# Altium PCB ESP_VGA.PcbDoc
Units mm, origin at the board's own origin, x right, y up, seen from the top; angles counter-clockwise.
Board outline 30.75 x 70 mm, 2 copper layers (Top Layer, Bottom Layer), stack 1.671 mm thick; 57 components, 54 nets, 209 pads, 74 vias.
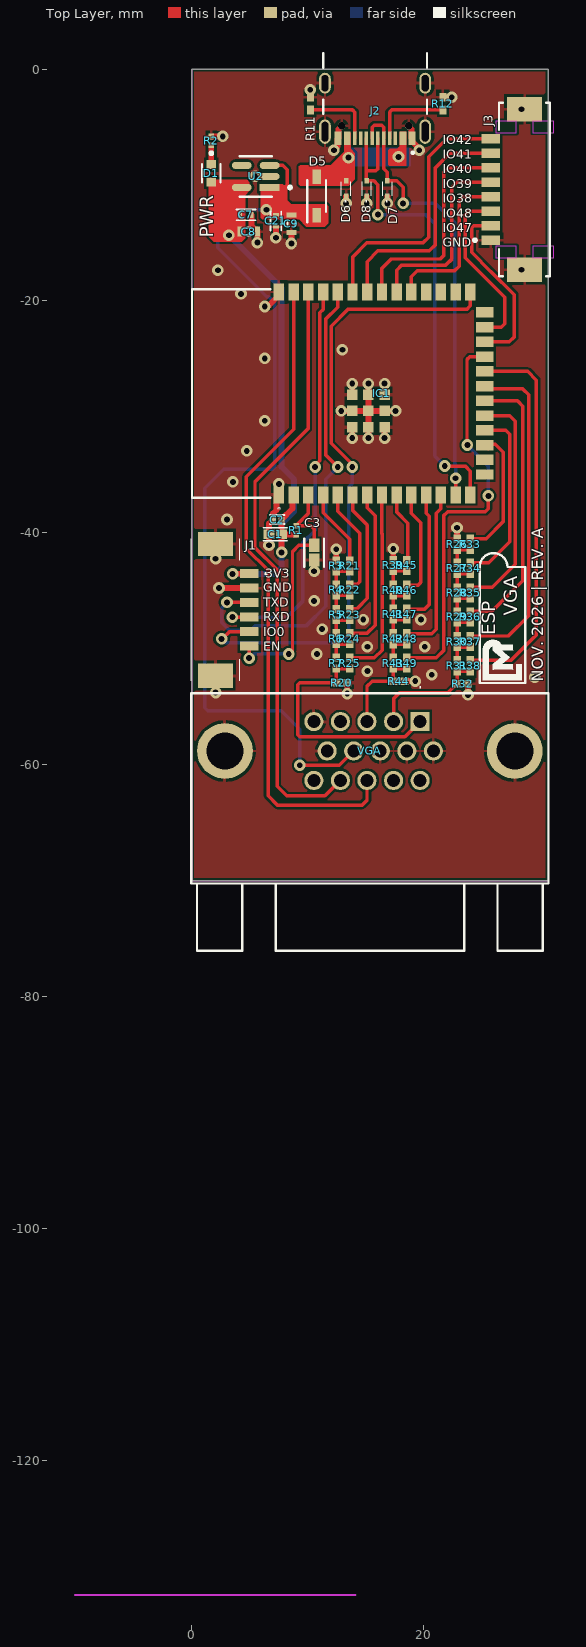
[diagram p0: Top Layer view]
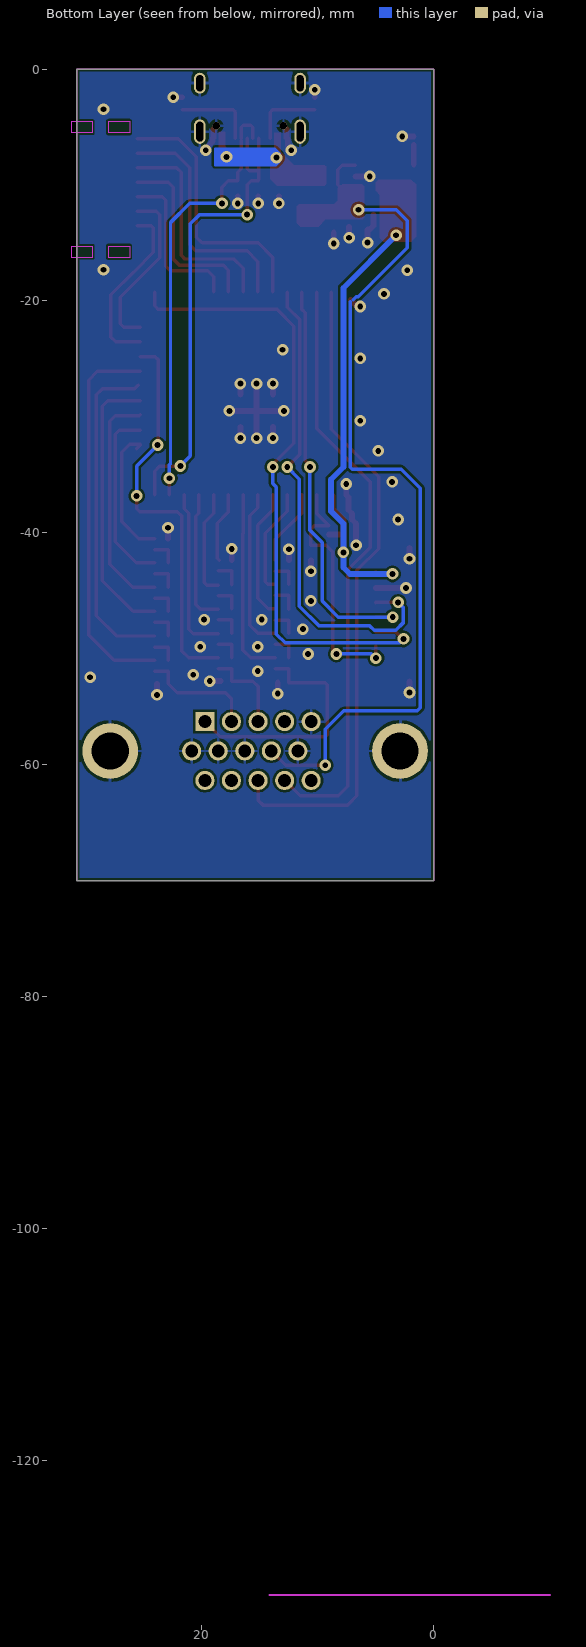
[diagram p1: Bottom Layer view, seen from below]

## Layer stack, top to bottom
Top Solder: solder mask 0.0102, Solder Resist, Dk 3.5
Top Layer: signal copper 0.0356
Dielectric 1: dielectric 1.6, FR-4, Dk 4.8
Bottom Layer: signal copper 0.0356
Bottom Solder: solder mask 0.0102, Solder Resist, Dk 3.5

## Board outline
0,-70 0,0 30.745,0 30.745,-70

## Design rules (kind name [scope] priority, off if disabled: settings)
Clearance [All] p1: gap=0.2 ignorepadtopadclearanceinfootprint=FALSE except(0.15: SMDPad-SMDPad)
Height [All] p1: minheight=0 maxheight=100 prefheight=12.7
PolygonConnect PolygonConnect_2 [HasFootprint('SOIC127P600X175-9N')] p1: connectstyle=Direct reliefconductorwidth=0.254 reliefentries=4 polygonreliefangle="90 Angle" airgapwidth=0.254
PolygonConnect PolygonConnect_1 [All] p2: thpad.connectstyle=Relief thpad.reliefconductorwidth=0.254 thpad.reliefentries=4 thpad.polygonreliefangle="90 Angle" thpad.airgapwidth=0.254 smdpad.connectstyle=Relief smdpad.reliefconductorwidth=0.254 smdpad.reliefentries=4 smdpad.polygonreliefangle="90 Angle" smdpad.airgapwidth=0.254 via.connectstyle=Direct via.reliefconductorwidth=0.254 via.reliefentries=4 via.polygonreliefangle="90 Angle" via.airgapwidth=0.254
RoutingVias [All] p1: holewidth=0.5 width=1 viastyle="Through Hole" minholewidth=0.5 minwidth=1 maxholewidth=0.5 maxwidth=1
SolderMaskExpansion [All] p1: expansion=0.102 istentingtop=FALSE
SupplyNets "Schematic Supply Nets_7" [InNet('+5V')] p1: voltage=0.000
SupplyNets "Schematic Supply Nets_6" [InNet('+3V3')] p2: voltage=0.000
SupplyNets "Schematic Supply Nets" [InNet('GND')] p3: voltage=0.000
SupplyNets "Schematic Supply Nets_3" [InNet('VBUS')] p4: voltage=0.000
Width [All] p1: maxlimit=1 minlimit=0.2 preferedwidth=0.2
29 further rules are at their usual default settings.

## Components (designator, comment, footprint, x,y, rotation, side; value= is the part's Value field where it differs from the comment)
C1 "C1608JB0J106K080AB" FP-C1608-080-0_1-IPC_C 7.217,-40.118 r180 top value=10u
C2 "C1005X7R1H104K050BB" FP-C1005-050-0_05-IPC_C 7.391,-38.843 r180 top value=100n
C3 "C1608X5R1H105K080AB" FP-C1608-080-0_1-IPC_B 10.569,-41.707 r270 top value=1u
C7 "C1005X5R1A105K050BB" CAPC1005X55X10LL05 4.681,-12.577 r0 top value=1µ
C8 "C1608X5R1E106M080AC" CAPC1608X100X20LL10 4.931,-14.02 r0 top value=10u
C9 "C1608X5R1E106M080AC" CAPC1608X100X20LL10 8.608,-13.343 r90 top value=10u
C21 "C1005X5R1A105K050BB" CAPC1005X55X10LL05 7.277,-13.093 r90 top value=1µ
D1 "LTST-C191KGKT" FP-LTST-C191KGKT-MFG 1.703,-8.989 r270 top value=Green
D5 "1N5819HW-7-F" SOD3716X125N 10.79,-10.943 r90 top locked
D6 "LESD5D5.0CT1G" LESD5D50CT1G 13.33,-10.308 r90 top locked
D7 "LESD5D5.0CT1G" LESD5D50CT1G 16.886,-10.308 r90 top locked
D8 "LESD5D5.0CT1G" LESD5D50CT1G 15.108,-10.308 r90 top locked
IC1 "ESP32-S3-WROOM-1-N16R8" ESP32S3WROOM1N16R8 12.791,-27.976 r90 top
J1 "53261-0671" 532610671 2.073,-46.626 r270 top
J2 "USB4105-GF-A" GCT_USB4105-GF-A 15.827,-1.221 r180 top
J3 "53261-0871" FP-532610871-MFG 28.71,-10.386 r270 top
R1 "RC0402FR-0710KL" RESC1005X40X25LL05T10 9.038,-39.755 r270 top value=10K
R2 "RC0402FR-07220RL" RESC1005X40X25LL05T10 1.703,-6.185 r270 top value=220
R3 "RC0402FR-07300RL" RESC1005X40X25ML05T10 12.47,-42.837 r90 top value=300R
R4 "RC0402FR-07150RL" RESC1005X40X25ML05T10 12.47,-44.909 r90 top value=150R
R5 "RC0402FR-07150RL" RESC1005X40X25ML05T10 12.475,-47.038 r90 top value=150R
R6 "RC0402FR-07150RL" RESC1005X40X25ML05T10 12.47,-49.106 r90 top value=150R
R7 "RC0402FR-07150RL" RESC1005X40X25ML05T10 12.475,-51.229 r90 top value=150R
R11 "RC0402FR-075K1P" RESC1005X40N 10.241,-2.98 r90 top value=5.1K
R12 "RC0402FR-075K1P" RESC1005X40N 21.671,-2.98 r90 top value=5.1K
R20 "RC0402FR-0782RL" RESC1005X40X25ML05T10 12.95,-52.906 r0 top value=82R
R21 "RC0402FR-07300RL" RESC1005X40X25ML05T10 13.634,-42.837 r270 top value=300R
R22 "RC0402FR-07300RL" RESC1005X40X25ML05T10 13.634,-44.911 r270 top value=300R
R23 "RC0402FR-07300RL" RESC1005X40X25ML05T10 13.634,-47.038 r270 top value=300R
R24 "RC0402FR-07300RL" RESC1005X40X25ML05T10 13.634,-49.106 r270 top value=300R
R25 "RC0402FR-07300RL" RESC1005X40X25ML05T10 13.634,-51.229 r270 top value=300R
R26 "RC0402FR-07300RL" RESC1005X40X25ML05T10 22.892,-40.97 r90 top value=300R
R27 "RC0402FR-07150RL" RESC1005X40X25ML05T10 22.892,-43.041 r90 top value=150R
R28 "RC0402FR-07150RL" RESC1005X40X25ML05T10 22.892,-45.171 r90 top value=150R
R29 "RC0402FR-07150RL" RESC1005X40X25ML05T10 22.892,-47.238 r90 top value=150R
R30 "RC0402FR-07150RL" RESC1005X40X25ML05T10 22.892,-49.362 r90 top value=150R
R31 "RC0402FR-07150RL" RESC1005X40X25ML05T10 22.892,-51.455 r90 top value=150R
R32 "RC0402FR-0782RL" RESC1005X40X25ML05T10 23.367,-53.013 r0 top value=82R
R33 "RC0402FR-07300RL" RESC1005X40X25ML05T10 24.043,-40.97 r270 top value=300R
R34 "RC0402FR-07300RL" RESC1005X40X25ML05T10 24.043,-43.041 r270 top value=300R
R35 "RC0402FR-07300RL" RESC1005X40X25ML05T10 24.043,-45.171 r270 top value=300R
R36 "RC0402FR-07300RL" RESC1005X40X25ML05T10 24.043,-47.238 r270 top value=300R
R37 "RC0402FR-07300RL" RESC1005X40X25ML05T10 24.043,-49.362 r270 top value=300R
R38 "RC0402FR-07300RL" RESC1005X40X25ML05T10 24.043,-51.455 r270 top value=300R
R39 "RC0402FR-07300RL" RESC1005X40X25ML05T10 17.39,-42.802 r90 top value=300R
R40 "RC0402FR-07150RL" RESC1005X40X25ML05T10 17.39,-44.932 r90 top value=150R
R41 "RC0402FR-07150RL" RESC1005X40X25ML05T10 17.39,-46.999 r90 top value=150R
R42 "RC0402FR-07150RL" RESC1005X40X25ML05T10 17.39,-49.123 r90 top value=150R
R43 "RC0402FR-07150RL" RESC1005X40X25ML05T10 17.39,-51.216 r90 top value=150R
R44 "RC0402FR-0782RL" RESC1005X40X25ML05T10 17.865,-52.775 r0 top value=82R
R45 "RC0402FR-07300RL" RESC1005X40X25ML05T10 18.551,-42.802 r270 top value=300R
R46 "RC0402FR-07300RL" RESC1005X40X25ML05T10 18.551,-44.932 r270 top value=300R
R47 "RC0402FR-07300RL" RESC1005X40X25ML05T10 18.551,-46.999 r270 top value=300R
R48 "RC0402FR-07300RL" RESC1005X40X25ML05T10 18.551,-49.123 r270 top value=300R
R49 "RC0402FR-07300RL" RESC1005X40X25ML05T10 18.551,-51.216 r270 top value=300R
U2 "AP2112K-3.3TRG1" FP-SOT25-IPC_A 5.535,-9.26 r180 top
VGA "L77HDE15SD1CH4FVGA" L77HDE15SD1CH4FVGA 19.709,-56.261 r0 top

## Footprints (in the part's own frame and the unit in brackets; to place one, negate y for a bottom-side part, rotate by r counter-clockwise, add the part's x,y. Pads: shape width x height; smd on the part's side, far side on the other; paste and mask are expansions set on the pad)
532610671 [mm]
  rect 0.8x1.6 smd: 1(-3.125,2.9) 2(-1.875,2.9) 3(-0.625,2.9) 4(0.625,2.9) 5(1.875,2.9) 6(3.125,2.9)
  rect 2.1x3 smd: MP1(-5.675,0) MP2(5.675,0)
  silkscreen extent -6.12,-2.1 6.12,4.4, body extent -6.32,-1.8 6.32,3.4, height 3.4
CAPC1005X55X10LL05 [mm] "Chip Capacitor, 2-Leads, Body 1.05x0.55mm, IPC High Density"
  rect 0.32x0.52 smd: 1(-0.5,0) 2(0.5,0)
  silkscreen extent -0.83,-0.46 0.83,0.46, body extent -0.53,-0.28 0.53,0.28, height 0.55
CAPC1608X100X20LL10 [mm] "Chip Capacitor, 2-Leads, Body 1.70x0.90mm, IPC High Density"
  rect 0.45x0.85 smd: 1(-0.75,0) 2(0.75,0)
  silkscreen extent -0.15,-0.33 0.15,0.33, body extent -0.85,-0.45 0.85,0.45, height 1
ESP32S3WROOM1N16R8 [mm]
  rect 1.5x0.9 smd: 1(-8.75,5.26) 2(-8.75,3.99) 3(-8.75,2.72) 4(-8.75,1.45) 5(-8.75,0.18) 6(-8.75,-1.09) 7(-8.75,-2.36) 8(-8.75,-3.63) 9(-8.75,-4.9) 10(-8.75,-6.17) 11(-8.75,-7.44) 12(-8.75,-8.71) 13(-8.75,-9.98) 14(-8.75,-11.25) 27(8.75,-11.25) 28(8.75,-9.98) 29(8.75,-8.71) 30(8.75,-7.44) 31(8.75,-6.17) 32(8.75,-4.9) 33(8.75,-3.63) 34(8.75,-2.36) 35(8.75,-1.09) 36(8.75,0.18) 37(8.75,1.45) 38(8.75,2.72) 39(8.75,3.99) 40(8.75,5.26)
  rect 0.9x1.5 smd: 15(-6.985,-12.5) 16(-5.715,-12.5) 17(-4.445,-12.5) 18(-3.175,-12.5) 19(-1.905,-12.5) 20(-0.635,-12.5) 21(0.635,-12.5) 22(1.905,-12.5) 23(3.175,-12.5) 24(4.445,-12.5) 25(5.715,-12.5) 26(6.985,-12.5)
  rect 0.9x0.9 smd: 41(-1.5,-2.46) 42(-2.9,-1.06) 43(-2.9,-2.46) 44(-2.9,-3.86) 45(-1.5,-3.86) 46(-0.1,-3.86) 47(-0.1,-2.46) 48(-0.1,-1.06) 49(-1.5,-1.06)
  silkscreen extent -9.96,5.15 9,12.75, body extent -9,-12.75 9,12.75, height 3.25
FP-532610871-MFG [mm]
  rect 0.8x1.6 smd paste+0 mask+0: 1(4.375,-2.9) 2(3.125,-2.9) 3(1.875,-2.9) 4(0.625,-2.9) 5(-0.625,-2.9) 6(-1.875,-2.9) 7(-3.125,-2.9) 8(-4.375,-2.9)
  rect 2.1x3 smd paste+0 mask+0: 9(-6.925,0) 10(6.925,0)
  Keep-Out Layer region: -5.875,0.7 -4.875,0.7 -4.875,2.5 -5.875,2.5
  Keep-Out Layer region: 4.875,0.7 5.875,0.7 5.875,2.5 4.875,2.5
  Keep-Out Layer region: 4.875,-2.5 5.875,-2.5 5.875,-0.7 4.875,-0.7
  Keep-Out Layer region: -5.875,-2.5 -4.875,-2.5 -4.875,-0.7 -5.875,-0.7
  silkscreen extent -7.47,-4.4 7.47,2.2, body extent -8.08,-3.8 8.08,2.3, height 0.25
FP-C1005-050-0_05-IPC_C [mm]
  rect 0.539x0.472 smd paste+0 mask+0: 1(-0.367,0) 2(0.367,0)
  silkscreen extent -0.64,-0.38 0.64,0.38, body extent -0.5,-0.25 0.5,0.25, height 0.55
FP-C1608-080-0_1-IPC_B [mm]
  rect 1.131x0.912 smd paste+0 mask+0: 1(-0.641,0) 2(0.641,0)
  silkscreen extent -1.21,-0.86 1.21,0.86, body extent -1.46,-0.71 1.46,0.71, height 0.25
FP-C1608-080-0_1-IPC_C [mm]
  rect 0.931x0.812 smd paste+0 mask+0: 1(-0.541,0) 2(0.541,0)
  silkscreen extent -1.01,-0.56 1.01,0.56, body extent -1.11,-0.55 1.11,0.55, height 0.25
FP-LTST-C191KGKT-MFG [mm]
  rect 0.8x0.8 smd paste+0 mask+0: 1(-0.75,0) 2(0.75,0)
  silkscreen extent -1.85,-0.8 0.8,0.8, body extent -1.25,-0.55 1.25,0.55, height 0.25
FP-SOT25-IPC_A [mm]
  rect 1.707x0.616 smd paste+0 mask+0: 1(-1.201,0.95)
  rrect100% 1.707x0.616 smd paste+0 mask+0: 2(-1.201,0) 3(-1.201,-0.95) 4(1.201,-0.95) 5(1.201,0.95)
  silkscreen extent -3.08,-1.75 1.4,1.75, body extent -2.55,-2 2.55,2, height 0.25
GCT_USB4105-GF-A [mm]
  rect 0.6x1.15 smd mask+0.05: A1_B12(-3.2,4.755) A4_B9(-2.4,4.755) B1_A12(3.2,4.755) B4_A9(2.4,4.755)
  rect 0.3x1.15 smd mask+0.05: A5(-1.25,4.755) A6(-0.25,4.755) A7(0.25,4.755) A8(1.25,4.755) B5(1.75,4.755) B6(0.75,4.755) B7(-0.75,4.755) B8(-1.75,4.755)
  oval 1x2.1 hole 0.6 slot 1.7 at 90 deg: SH1(-4.32,4.18) SH2(4.32,4.18)
  oval 1x1.8 hole 0.6 slot 1.4 at 90 deg: SH3(-4.32,0) SH4(4.32,0)
  round 0.65 hole 0.65 unplated: ""(-2.89,3.68) ""(2.89,3.68)
  silkscreen extent -4.47,-2.6 4.47,6.1, body extent -4.47,-2.47 4.47,5.24, height 3.31
L77HDE15SD1CH4FVGA [mm]
  rect 1.65x1.65 hole 1.1: 1(0,0)
  round 1.65 hole 1.1: 2(-2.29,0) 3(-4.58,0) 4(-6.87,0) 5(-9.16,0) 6(1.145,-2.54) 7(-1.145,-2.54) 8(-3.435,-2.54) 9(-5.725,-2.54) 10(-8.015,-2.54) 11(0,-5.08) 12(-2.29,-5.08) 13(-4.58,-5.08) 14(-6.87,-5.08) 15(-9.16,-5.08)
  round 4.8 hole 3.2: MH1(8.165,-2.54) MH2(-16.825,-2.54)
  silkscreen extent -19.73,-19.77 11.07,3, body extent -19.73,-19.89 11.08,2.21, height 12.47
LESD5D50CT1G [mm]
  rect 0.48x0.4 smd: 1(-0.66,0) 2(0.66,0)
  silkscreen extent -1.15,-0.4 0.6,0.4, body extent -0.8,-0.4 0.8,0.4, height 0.6
RESC1005X40N [mm]
  rect 0.75x0.6 smd: 1(-0.55,0) 2(0.55,0)
  body extent -0.5,-0.25 0.5,0.25, height 0.4
RESC1005X40X25LL05T10 [mm] "Chip Resistor, 2-Leads, Body 1.00x0.50mm, IPC High Density"
  rect 0.5x0.45 smd: 1(-0.375,0) 2(0.375,0)
  body extent -0.53,-0.27 0.53,0.28, height 0.4
RESC1005X40X25ML05T10 [mm] "Chip Resistor, 2-Leads, Body 1.00x0.50mm, IPC Low Density"
  rect 0.7x0.65 smd: 1(-0.475,0) 2(0.475,0)
  body extent -0.53,-0.27 0.53,0.28, height 0.4
SOD3716X125N [mm]
  rect 1.25x0.75 smd: 1(-1.65,0) 2(1.65,0)
  silkscreen extent -2.27,-0.8 1.35,0.8, body extent -1.35,-0.8 1.35,0.8, height 1.25

## Part data
C1: "MLCC 10μF ±10% 6.3V JB SMD 0603", Case Code (Imperial)=0603, Case Code (Metric)=1608, Dielectric Material=Ceramic, Max Operating Temperature=85°C, Min Operating Temperature=-25°C, Package Quantity=4000, Tolerance=10%, Voltage Rating=6.3V, Case/Package=0603, Height=0.8mm, Lead Free="Lead Free", Length=0.063inch, Mount="Surface Mount", Packaging="Tape and Reel", Resistor Type=Ceramic, RoHS Compliant=Yes, Series=C, Termination=SMD/SMT, Thickness=0.035inch, Voltage Rating (DC)=6.3V, Width=0.8mm
C2: "MLCC 100nF ±10% 50V X7R SMD 0402", Case Code (Imperial)=0402, Case Code (Metric)=1005, Dielectric=X7R, Dielectric Material=Ceramic, Max Operating Temperature=125°C, Min Operating Temperature=-55°C, Package Quantity=1, Tolerance=10%, Voltage=50V, Case/Package=0402, Construction=Flat, Depth=0.5mm, Height=0.5mm, Lead Free="Lead Free", Length=1mm, Mount="Surface Mount", Packaging="Tape and Reel", Part Number=C1005X7R1H104K050BB, Radiation Hardening=No, REACH SVHC="No SVHC", Resistor Type=Ceramic, RoHS Compliant=Yes, Series=C, Termination=SMD/SMT, Thickness=0.022inch, Voltage Rating=50V, Voltage Rating (DC)=50V, Weight=2.3E-05oz, Width=0.02inch
C3: "MLCC 1μF ±10% 50V X5R SMD 0603", Case Code (Imperial)=0603, Case Code (Metric)=1608, Dielectric=X5R, Dielectric Material=Ceramic, Max Operating Temperature=85°C, Min Operating Temperature=-55°C, Package Quantity=1, Tolerance=10%, Voltage=50V, Case/Package=0603, Construction=Flat, Depth=0.8mm, Height=0.8mm, Lead Free="Lead Free", Length=1.6mm, Mount="Surface Mount", Number of Pins=2, Packaging="Tape and Reel", Part Number=C1608X5R1H105K080AB, Radiation Hardening=No, REACH SVHC="No SVHC", Resistor Type=Ceramic, RoHS Compliant=Yes, Series=C, Termination=SMD/SMT, Thickness=0.035inch, Voltage Rating=50V, Voltage Rating (DC)=50V, Weight=7.1E-05oz, Width=0.031inch
C7 C21: "MLCC 1 uF, +/- 10%, 10 V, -55 to 85 degC, 0402 (1005 Metric), RoHS, Tape and Reel", Manufacturer=TDK, Operating Temperature=-55°C~85°C, Package / Case=0402(1005Metric), Package Description="2-Pin Surface Mount Device, Body 1 x 0.5 mm", Package Reference=1005, PCN Part Number=MLCCPartNumberChange30/Nov/2012, Ratings=-, Standard Package=1, Temperature Coefficient=X5R, Tolerance=±10%, Voltage - Rated=10V, Applications=GeneralPurpose, Category=Capacitors, Datasheet URL=http://download.siliconexpert.com/pdfs/2015/4/21/15/54/45/779/tdk_/manual/37024850441143360mlcc_commercial_general_en.pdf, Datasheet Version=03/2015, Family=CeramicCapacitors, Features=-, Height - Seated (Max)=-, Lead Spacing=-, Lead Style=-, Manufacturer URL=http://www.tdk.com/, Mounting Technology=SurfaceMount, Mounting Type=SurfaceMount,MLCC, Online Catalog=CSeries,GeneralPurpose, Other Names=445-4114-6, Packaging=Digi-Reel®, Part Number=C1005X5R1A105K050BB, Product Training Modules=CSeriesGeneralApplicationsSEAT,CCV,andTVCLDesignToolsGuidetoReplacinganElectrolyticCapacitorwithanMLCC, RoHS Information=RoHSCertificate-MLCC, Series=C, Size / Dimension="0.039\"Lx0.020\"W(1.00mmx0.50mm)", Thickness (Max)="0.022\"(0.55mm)"
C8 C9: "MLCC 10UF, 25V", Manufacturer_Name=TDK, Mouser Part Number=810-C1608X5R1E106M, Arrow Part Number=C1608X5R1E106M080AC, Arrow Price/Stock=https://www.arrow.com/en/products/c1608x5r1e106m080ac/tdk.html?utm_currency=USD&region=nac, Datasheet Link=https://product.tdk.com/info/en/catalog/datasheets/mlcc_commercial_midvoltage_en.pdf, Height=0.8mm, Manufacturer_Part_Number=C1608X5R1E106M080AC, Mouser Price/Stock=https://www.mouser.co.uk/ProductDetail/TDK/C1608X5R1E106M080AC?qs=dfay7wIA1uGdHfZTkqsICA%3D%3D
D1: "LED GREEN CLEAR SMD", Case Code (Imperial)=0603, Case Code (Metric)=1608, Forward Current=20mA, Forward Voltage=2V, Illumination Color=Green, Lens Color="Clear, Colorless", Max Operating Temperature=85°C, Min Operating Temperature=-55°C, Power Dissipation=75mW, Reverse Voltage=5V, Case/Package=0603, Depth=800µm, Dominant Wavelength=571nm, Height=550µm, Lead Free="Lead Free", Length=1.6mm, Lens Style=Clear, Lens Transparency=Clear, Luminous Intensity=35mcd, Mount="Surface Mount", NexarPartId=549907, Number of Elements=1, Number of LEDs=1, Number of Pins=2, Packaging="Tape and Reel", Power Rating=75mW, Radiation Hardening=No, RoHS=Compliant, Schedule B="8541402000, 8541402000", Test Current=20mA, Viewing Angle=130°, Wavelength=574nm, Width=800µm
D5: "Diode", Manufacturer_Name="Multicomp Pro", Datasheet Link=http://www.farnell.com/datasheets/1693720.pdf, Height=1.25mm, Manufacturer_Part_Number=1N5819HW-7-F
D6 D7 D8: "TVS Diode (Bi-directional)", Manufacturer_Name=LRC, Height=0.7mm, Manufacturer_Part_Number=LESD5D5.0CT1G
IC1: "Integrated Circuit", Manufacturer_Name="Espressif Systems", Mouser Part Number=356-ESP32S3WRM1N16R8, Datasheet Link=https://www.espressif.com/sites/default/files/documentation/esp32-s3-wroom-1_wroom-1u_datasheet_en.pdf, Height=3.25mm, Manufacturer_Part_Number=ESP32-S3-WROOM-1-N16R8, Mouser Price/Stock=https://www.mouser.co.uk/ProductDetail/Espressif-Systems/ESP32-S3-WROOM-1-N16R8?qs=Li%252BoUPsLEnvQc9gW6AMhZg%3D%3D
J1: "Connector", Manufacturer_Name=Molex, Mouser Part Number=538-53261-0671, Arrow Part Number=53261-0671, Arrow Price/Stock=https://www.arrow.com/en/products/53261-0671/molex?region=nac, Datasheet Link=https://www.molex.com/pdm_docs/sd/532610671_sd.pdf, Height=3.6mm, Manufacturer_Part_Number=53261-0671, Mouser Price/Stock=https://www.mouser.co.uk/ProductDetail/Molex/53261-0671?qs=%252B72YyncTwW9Wyr77z4J2cA%3D%3D
J2: Package=None, Availability=Unavailable, MF="{'manufacturer': u'GCT'}", MP=USB4105-GF-A, Price=None
J3: library part CMP-04776-000063-2, "CONN HEADER SMD R/A 8POS 1.25MM", Ambient Temperature Range High=105°C, Color=Beige, Contact Resistance=20mΩ, Current Rating=1A, Flammability Rating="UL94 V-0", Insulation Resistance=100MΩ, Manufacturer Lifecycle Status=ACTIVE, Max Operating Temperature=85°C, Min Operating Temperature=-40°C, Voltage Rating=125V, Contact Material="Brass, Tin", Contact Plating=Tin, Country of Origin=SG, Gender=Male, Glow Wire Compliant=Non-compliant, Height=3.6mm, Housing Material=Thermoplastic, Lead Free="Lead Free", Lead Pitch=1.25mm, Lifecycle Status=Production, Mount="Surface Mount", NexarPartId=655316, Number of Circuits=8, Number of Contacts=8, Number of Pins=8, Number of Positions=8, Number of Rows=1, Orientation="Right Angle", Packaging="Cut Tape", Pitch=1.25mm, Plating=Tin, Radiation Hardening=No, REACH SVHC=Unknown, RoHS=Compliant, Schedule B=8536694040, Termination=Solder, Voltage Rating (AC)=125V, Voltage Rating (DC)=125V, Working Voltage=125V
R1 R2 R3 R4 R5 R6 R7 R20 R21 R22 R23 R24 R25 R26 R27 R28 R29 R30 R31 R32 R33 R34 R35 R36 R37 R38 R39 R40 R41 R42 R43 R44 R45 R46 R47 R48 R49: Manufacturer="Yageo / Phycomp"
  R1: Part Number=RC0402FR-0710KL
  R2: Part Number=RC0402FR-07220RL, Supplier 1=Avnet, Supplier Part Number 1=RC0402FR-07220RL
  R3 R21 R22 R23 R24 R25 R26 R33 R34 R35 R36 R37 R38 R39 R45 R46 R47 R48 R49: Part Number=RC0402FR-07300RL
  R4 R5 R6 R7 R27 R28 R29 R30 R31 R40 R41 R42 R43: Part Number=RC0402FR-07150RL
  R20 R32 R44: Part Number=RC0402FR-0782RL
R11 R12: library part RES, "RES SMD 5.1KOHM 1% 1/16W 0402", Manufacturer=Yageo, Package Size="0402 (1005 Metric)", Rated Power="0.063W, 1/16W", Temperature Coefficient=100ppm/C, Tolerance=1%, CLASS=DISCRETE, PART_NUMBER=TMP-441
U2: library part CMP-12756-000035-1, "IC REG LINEAR 3.3V 600MA SOT25", Case/Package=SOT-23-5, Dropout Voltage=250mV, Max Input Voltage=6V, Max Operating Temperature=85°C, Max Output Current=600mA, Min Input Voltage=2.5V, Min Operating Temperature=-40°C, Output Voltage=3.3V, Package Quantity=1, Quiescent Current=55uA, Accuracy=1.5%, Height=1.3mm, Lead Free="Lead Free", Length=3.1mm, Mount="Surface Mount", Number Of Outputs=1, Number of Pins=5, Number of Regulators=1, Output Current=600mA, Output Type=Fixed, Packaging="Tape and Reel", Polarity=Positive, Width=1.7mm
VGA: "Connector", Manufacturer_Name="Amphenol Communications Solutions", Mouser Part Number=523-7HDE15SD1CH4FVGA, Arrow Part Number=L77HDE15SD1CH4FVGA, Arrow Price/Stock=https://www.arrow.com/en/products/l77hde15sd1ch4fvga/amphenol-fci.html?utm_currency=USD&region=nac, Datasheet Link=https://cdn.amphenol-cs.com/media/wysiwyg/files/drawing/l77hde15sd1ch4fvga.pdf, Height=12.85mm, Manufacturer_Part_Number=L77HDE15SD1CH4FVGA, Mouser Price/Stock=https://www.mouser.co.uk/ProductDetail/Amphenol-Commercial-Products/L77HDE15SD1CH4FVGA?qs=ToP8pWlZ0bNtQSp9f8k5Rw%3D%3D

## Via types
v1: diameter 1, hole 0.5, Top Layer to Bottom Layer, tented both sides, 74 vias

## Nets (pads, with @x,y where several pads share a name; then routed paths per layer and width w, separated by ;. In a path a pad name is that pad's centre, name@x,y a point inside that pad or via, vN(x,y) a via of type N, cw(c..) or ccw(c..) an arc to the next point about the centre after c; other vN are vias at no path point)
+3V3: C1.1 C2.1 C7.1 C8.1 D1.2 IC1.2 J1.1 R1.2 U2.5 | length 48.6
  Top Layer w0.5: v1(3.224,-14.336) 4.182,-13.379 C7.1@4.182,-12.587 ; v1(3.538,-43.531) 3.553,-43.516 4.958,-43.516 J1.1 ; C7.1 4.182,-11.42 4.334,-11.268 U2.5 ; C1.1 C1.1@7.764,-40.125 ; C2.1@7.764,-38.843 C1.1@7.764,-40.125 ; v1(7.77,-41.681) 7.764,-41.675 C1.1@7.764,-40.125 ; C2.1@7.777,-38.829 8.711,-37.896 8.711,-36.816 IC1.2 ; R1.2 7.769,-40.13 C1.1@7.764,-40.125
  Bottom Layer w0.5: v1(3.224,-14.336) 7.77,-18.882 7.77,-34.311 8.847,-35.388 8.847,-38.132 7.77,-39.209 v1(7.77,-41.681) 7.77,-42.971 7.21,-43.531 v1(3.538,-43.531)
+5V: C9.2 C21.2 D5.1 U2.1 U2.3 VGA.9 | length 75.2
  Top Layer w0.3: U2.1 8.017,-10.21 8.242,-9.985 8.242,-8.674 7.878,-8.31 U2.3 ; v1(9.333,-60.037) 12.749,-60.037 VGA.9
  Bottom Layer w0.3: v1(6.458,-12.134) 3.224,-12.134 2.271,-13.088 2.271,-15.397 6.497,-19.623 6.672,-19.623 6.927,-19.878 ; 7.17,-20.046 7.17,-34.322 6.995,-34.497 2.773,-34.497 1.128,-36.142 1.128,-55.065 1.408,-55.344 7.737,-55.344 9.333,-56.94 v1(9.333,-60.037)
CC1+: J2.A5 R12.1 | length 6.9
  Top Layer w0.3: J2.A5 17.077,-3.706 17.253,-3.53 R12.1
CC2+: J2.B5 R11.1 | length 6.2
  Top Layer w0.3: R11.1 13.881,-3.53 14.077,-3.727 J2.B5
CHIP_PU: C3.1 IC1.3 J1.6 R1.1 | length 21.8
  Top Layer w0.3: v1(4.965,-50.787) 4.965,-49.759 J1.6 ; v1(8.376,-50.435) 8.707,-50.104 8.707,-41.605 9.246,-41.066 C3.1 10.569,-39.673 10.275,-39.38 R1.1 9.038,-39.355 10.071,-38.321 IC1.3
  Bottom Layer w0.3: v1(4.965,-50.787) 5.053,-50.699 5.124,-50.699 5.388,-50.435 v1(8.376,-50.435)
D+: D8.2 IC1.14 J2.A6 J2.B6 | length 41.8
  Top Layer w0.3: D8.2@15.077,-9.49 15.077,-8.784 ; J2.B6 15.077,-8.784 ; D8.2 15.731,-9.648 16.071,-9.989 v1(16.071,-12.548) ; 16.071,-8.54 16.077,-8.534 ; J2.A6 16.077,-8.534 ; v1(21.827,-34.231) 23.595,-34.231 24.041,-34.678 IC1.14 ; 15.077,-8.784 15.901,-8.784 16.077,-8.608 16.077,-8.534
  Bottom Layer w0.3: v1(16.071,-12.548) 20.155,-12.548 20.962,-13.355 20.962,-33.366 v1(21.827,-34.231)
D-: D7.2 IC1.13 J2.A7 J2.B7 | length 38.3
  Top Layer w0.3: J2.A7 15.577,-5.019 15.753,-4.843 16.401,-4.843 16.577,-5.019 J2.B7 ; J2.B7@16.577,-6.166 16.577,-8.602 16.886,-8.911 D7.2 17.685,-9.648 18.242,-10.205 v1(18.242,-11.583) ; IC1.13 v1(22.771,-35.277)
  Bottom Layer w0.3: v1(18.242,-11.583) 21.026,-11.583 22.677,-13.234 22.677,-34.019 22.771,-34.113 v1(22.771,-35.277)
GND: C1.2 C2.2 C3.2 C7.2 C8.2 C9.1 C21.1 D6.1 D7.1 D8.1 IC1.1 IC1.40 IC1.41 IC1.42 IC1.43 IC1.44 IC1.45 IC1.46 IC1.47 IC1.48 IC1.49 J1.2 J1.MP1 J1.MP2 J2. J2.A1_B12 J2.B1_A12 J2.SH1 J2.SH2 J2.SH3 J2.SH4 J3.1 J3.9 J3.10 R2.1 R3.2 R11.2 R12.2 R20.2 R26.2 R32.2 R39.2 R44.2 U2.2 VGA.5 VGA.6 VGA.7 VGA.8 VGA.10 VGA.MH1 VGA.MH2 | length 45.9
  Top Layer w0.5: R2.1 v1(2.701,-5.81) ; v1(2.073,-53.759) J1.MP2@2.073,-52.811 ; v1(2.073,-42.222) J1.MP1@2.073,-41.274 ; v1(2.372,-44.751) J1.2 ; C7.2 5.181,-13.52 5.506,-13.845 5.656,-13.845 5.681,-13.87 C8.2 v1(5.681,-14.968) ; v1(5.503,-9.26) U2.2 ; v1(6.32,-20.473) 6.416,-20.377 6.688,-20.377 IC1.40@7.14,-19.925 ; v1(6.677,-41.066) C1.2 6.677,-39.185 7.024,-38.837 7.024,-38.321 7.331,-38.014 7.331,-36.926 IC1.1 v1(7.531,-35.778) ; v1(7.277,-14.541) C21.1 ; v1(8.608,-15.041) C9.1 ; R11.2 v1(10.241,-1.795) ; v1(10.569,-43.296) C3.2 ; v1(12.273,-7.002) 12.273,-6.975 12.577,-6.67 12.577,-6.026 12.677,-5.926 12.677,-5.201 12.937,-4.941 J2.@12.937,-4.901 ; R3.2 v1(12.47,-41.414) ; v1(12.903,-29.476) IC1.49 IC1.41 IC1.45 v1(17.599,-29.476) ; v1(13.33,-11.583) D6.1 ; v1(13.425,-53.855) R20.2 ; v1(13.851,-31.824) IC1.42 ; IC1.48 v1(13.851,-27.128) ; D8.1 15.108,-11.583 v1(15.112,-11.587) ; v1(15.251,-31.824) IC1.43 IC1.47 v1(15.251,-27.128) ; v1(16.651,-31.824) IC1.44 ; IC1.46 v1(16.651,-27.128) ; v1(16.886,-11.583) D7.1 ; R39.2 v1(17.39,-41.379) ; R44.2 v1(19.289,-52.775) ; J2.@18.717,-4.901 18.717,-4.941 18.977,-5.201 18.977,-5.926 J2.A1_B12 19.027,-6.251 19.543,-6.767 19.543,-6.906 v1(19.639,-7.002) ; R12.2 v1(22.433,-2.43) ; R26.2 v1(22.892,-39.547) ; v1(23.842,-53.962) R32.2
  other v1: 29.609,-52.443 20.718,-52.227 15.162,-51.914 10.812,-50.435 15.162,-49.819 20.11,-49.819 11.262,-48.292 14.806,-47.474 19.777,-47.474 10.569,-45.864 3.058,-38.843 3.569,-35.597 4.767,-32.923 6.32,-30.318 6.32,-24.953 13.01,-24.209 4.268,-19.387 2.271,-17.351 28.454,-17.313 28.454,-3.463
GPIO0: IC1.27 J1.5 | length 55.4
  Top Layer w0.3: v1(2.59,-49.137) 2.66,-49.137 3.297,-48.501 J1.5 ; v1(13.851,-34.311) 13.851,-34.071 12.053,-32.273 12.053,-22.164 13.487,-20.73 23.722,-20.73 24.041,-20.411 IC1.27
  Bottom Layer w0.3: v1(2.59,-49.137) 2.92,-49.467 12.797,-49.467 13.545,-48.72 13.545,-36.039 13.851,-35.734 v1(13.851,-34.311)
GPIO38: IC1.31 J3.4 | length 14.1
  Top Layer w0.3: IC1.31 18.961,-17.914 19.473,-17.402 22.678,-17.402 23.077,-17.002 23.077,-11.323 23.388,-11.013 J3.4@25.554,-11.013
GPIO39: IC1.32 J3.5 | length 16.5
  Top Layer w0.3: IC1.32 17.691,-17.353 18.143,-16.902 21.933,-16.902 22.455,-16.38 22.455,-10.18 22.872,-9.763 J3.5@25.554,-9.763
GPIO40: IC1.33 J3.6 | length 19
  Top Layer w0.3: IC1.33 16.421,-17.173 17.214,-16.38 21.433,-16.38 21.766,-16.047 21.766,-8.911 22.164,-8.513 J3.6@25.554,-8.513
GPIO41: IC1.34 J3.7 | length 20.8
  Top Layer w0.3: IC1.34 15.151,-16.604 16.071,-15.683 20.488,-15.683 21.032,-15.139 21.032,-8.5 22.27,-7.263 J3.7@25.554,-7.263
GPIO42: IC1.35 J3.8 | length 23
  Top Layer w0.3: IC1.35 13.881,-16.216 15.108,-14.989 19.962,-14.989 20.458,-14.494 20.458,-7.577 22.021,-6.013 J3.8@25.554,-6.013
GPIO47: IC1.24 J3.2 | length 15.1
  Top Layer w0.3: IC1.24 27.406,-23.531 27.828,-23.108 27.828,-19.474 25.825,-17.471 25.81,-17.471 24.154,-15.815 24.154,-13.702 24.344,-13.513 J3.2@25.554,-13.513
GPIO48: IC1.25 J3.3 | length 14.7
  Top Layer w0.3: IC1.25 26.71,-22.261 27.009,-21.961 27.009,-19.662 23.618,-16.271 23.618,-12.559 23.915,-12.263 J3.3@25.554,-12.263
NetD1_1: D1.1 R2.2 | length 1.7
  Top Layer w0.5: D1.1 R2.2
NetR3_1: R3.1 R4.2 R21.2 | length 2.3
  Top Layer w0.3: R4.2 R3.1 R21.2
NetR4_1: R4.1 R5.2 R22.2 | length 2.3
  Top Layer w0.3: R4.1 R4.1@12.471,-45.385 ; R5.2 12.473,-46.561 12.473,-45.386 R4.1@12.471,-45.385 ; R22.2 13.633,-45.385 R4.1@12.471,-45.385
NetR5_1: R5.1 R6.2 R23.2 | length 2.3
  Top Layer w0.3: R6.2 12.473,-48.628 12.473,-47.516 R5.1 R23.2
NetR6_1: R6.1 R7.2 R24.2 | length 2.3
  Top Layer w0.3: R7.2 12.473,-50.752 12.473,-49.583 R6.1 R24.2
NetR26_1: R26.1 R27.2 R33.2 | length 2.3
  Top Layer w0.3: R27.2 R26.1 R33.2
NetR27_1: R27.1 R28.2 R34.2 | length 2.3
  Top Layer w0.3: R28.2 R27.1 R34.2
NetR28_1: R28.1 R29.2 R35.2 | length 2.3
  Top Layer w0.3: R29.2 R28.1 R35.2
NetR29_1: R29.1 R30.2 R36.2 | length 2.3
  Top Layer w0.3: R30.2 R29.1 R36.2
NetR30_1: R30.1 R31.2 R37.2 | length 2.3
  Top Layer w0.3: R31.2 R30.1 R37.2
NetR39_1: R39.1 R40.2 R45.2 | length 2.3
  Top Layer w0.3: R40.2 R39.1 R45.2
NetR40_1: R40.1 R41.2 R46.2 | length 2.3
  Top Layer w0.3: R41.2 R40.1 R46.2
NetR41_1: R41.1 R42.2 R47.2 | length 2.3
  Top Layer w0.3: R42.2 R41.1 R47.2
NetR42_1: R42.1 R43.2 R48.2 | length 2.3
  Top Layer w0.3: R43.2 R42.1 R48.2
U0RXD: IC1.37 J1.4 | length 35.5
  Top Layer w0.3: v1(3.523,-47.26) 3.527,-47.255 4.969,-47.255 J1.4 ; v1(10.651,-34.311) 10.651,-34.187 11.053,-33.785 11.053,-21.019 11.341,-20.73 IC1.37
  Bottom Layer w0.3: v1(3.523,-47.26) 3.538,-47.275 8.198,-47.275 8.373,-47.1 9.608,-45.865 9.608,-40.826 10.651,-39.782 v1(10.651,-34.311)
U0TXD: IC1.36 J1.3 | length 42.4
  Top Layer w0.3: v1(3.056,-45.985) 3.064,-45.993 4.965,-45.993 J1.3 ; v1(12.611,-34.311) 11.553,-33.253 11.553,-21.589 12.611,-20.53 IC1.36
  Bottom Layer w0.3: v1(3.056,-45.985) 2.59,-46.451 2.59,-47.726 3.258,-48.395 5.124,-48.395 5.497,-48.022 9.866,-48.022 11.568,-46.32 11.568,-35.355 v1(12.611,-34.311)
VBUS: D5.2 D6.2 J2.A4_B9 J2.B4_A9 | length 0.7
  Top Layer w0.3: D5.2@10.917,-9.293 10.943,-9.267 11.552,-9.267 ; D6.2 D6.2@13.373,-9.606 ; J2.B4_A9@13.421,-5.982 J2.B4_A9 ; J2.A4_B9 J2.A4_B9@18.234,-5.983
  other v1: 13.537,-7.637 17.848,-7.577
VGA_B0: IC1.9 R45.1 | length 6.1
  Top Layer w0.3: IC1.9 17.691,-38.196 18.644,-39.149 18.644,-42.187 R45.1@18.468,-42.362
VGA_B1: IC1.10 R46.1 | length 9.2
  Top Layer w0.3: R46.1@18.551,-44.492 19.557,-44.492 19.777,-44.272 19.777,-39.126 18.961,-38.309 IC1.10
VGA_B2: IC1.11 R47.1 | length 11.7
  Top Layer w0.3: R47.1@18.551,-46.56 20.11,-46.56 20.498,-46.172 20.498,-38.576 20.231,-38.309 IC1.11
VGA_B3: IC1.12 R48.1 | length 14.4
  Top Layer w0.3: R48.1@18.551,-48.683 20.718,-48.683 21.099,-48.302 21.099,-38.309 21.501,-37.907 IC1.12
VGA_B4: IC1.23 R49.1 | length 34.4
  Top Layer w0.3: R49.1@18.551,-50.776 21.099,-50.776 21.728,-50.147 21.728,-38.532 22.085,-38.175 25.33,-38.175 25.597,-37.907 v1(25.597,-36.808) ; v1(23.787,-32.421) 23.753,-32.387 23.753,-25.05 24.002,-24.801 IC1.23
  Bottom Layer w0.3: v1(23.787,-32.421) 25.597,-34.231 v1(25.597,-36.808)
VGA_B_OUT: R43.1 R44.1 R49.2 VGA.3 | length 7.7
  Top Layer w0.3: VGA.3 15.129,-53.225 15.58,-52.775 R44.1 R43.1 R49.2
VGA_G0: IC1.17 R33.1 | length 11.7
  Top Layer w0.3: R33.1 25.408,-40.495 26.886,-39.016 26.886,-33.026 26.201,-32.34 IC1.17@25.291,-32.34 ; IC1.17 IC1.17@25.591,-32.721
VGA_G1: IC1.18 R34.1 | length 15.7
  Top Layer w0.3: R34.1 25.637,-42.566 27.427,-40.776 27.427,-31.479 27.1,-31.151 IC1.18
VGA_G2: IC1.19 R35.1 | length 19.9
  Top Layer w0.3: R35.1 25.924,-44.696 27.927,-42.692 27.927,-30.372 27.436,-29.881 25.372,-29.881 IC1.19@25.291,-29.8
VGA_G3: IC1.20 R36.1 | length 24.1
  Top Layer w0.3: R36.1 25.908,-46.763 28.565,-44.106 28.565,-29.074 28.102,-28.611 IC1.20
VGA_G4: IC1.21 R37.1 | length 28.7
  Top Layer w0.3: R37.1 27.312,-48.887 29.068,-47.131 29.068,-28.089 28.565,-27.587 25.805,-27.587 IC1.21@25.479,-27.26
VGA_G5: IC1.22 R38.1 | length 33.3
  Top Layer w0.3: R38.1 27.547,-50.98 29.725,-48.802 29.725,-26.818 28.977,-26.071 IC1.22
VGA_G_OUT: R31.1 R32.1 R38.2 VGA.2 | length 10.2
  Top Layer w0.3: VGA.2 17.419,-54.295 17.936,-53.778 22.103,-53.778 22.867,-53.013 R32.1 R31.1 R38.2
VGA_HSYNC: IC1.39 VGA.13 | length 56.6
  Top Layer w0.3: IC1.39 8.801,-31.075 4.728,-35.148 4.728,-41.348 6.603,-43.223 6.603,-62.673 7.389,-63.459 14.706,-63.459 15.129,-63.036 VGA.13
VGA_R0: IC1.4 R21.1 | length 6.6
  Top Layer w0.3: IC1.4 11.341,-38.251 13.634,-40.544 R21.1
VGA_R1: IC1.5 R22.1 | length 9.2
  Top Layer w0.3: IC1.5 12.611,-38.124 14.5,-40.012 14.5,-44.219 14.282,-44.436 R22.1
VGA_R2: IC1.6 R23.1 | length 11.3
  Top Layer w0.3: R23.1 13.673,-46.524 14.267,-46.524 15.162,-45.629 15.162,-39.315 13.881,-38.034 IC1.6
VGA_R3: IC1.7 R24.1 | length 14
  Top Layer w0.3: R24.1 15.162,-48.631 15.831,-47.962 15.831,-38.514 15.151,-37.834 IC1.7
VGA_R4: IC1.8 R25.1 | length 16.5
  Top Layer w0.3: R25.1 13.656,-50.776 15.764,-50.776 16.429,-50.11 16.429,-40.059 16.421,-40.051 IC1.8
VGA_R_OUT: R7.1 R20.1 R25.2 VGA.1 | length 21.2
  Top Layer w0.3: R25.2 R7.1 R20.1 9.333,-52.906 9.157,-53.082 9.157,-57.392 9.333,-57.567 18.403,-57.567 VGA.1
VGA_VSYNC: IC1.38 VGA.14 | length 51.7
  Top Layer w0.3: IC1.38 10.071,-30.999 5.474,-35.597 5.474,-41.274 7.389,-43.19 7.389,-61.846 8.216,-62.673 11.508,-62.673 VGA.14
pads on no net: IC1.15 IC1.16 IC1.26 IC1.28 IC1.29 IC1.30 J2.A8 J2.B8 U2.4 VGA.4 VGA.11 VGA.12 VGA.15

## Polygon pours and split planes (outlines as drawn)
GND on Bottom Layer "GND_L02_P000" (solid, remove dead copper, pour order 0): 0.006,-0.01 0.006,-70.001 31.001,-70.001 31.001,0 31,0
GND on Top Layer "GND_L01_P001" (solid, remove dead copper, pour order 1): -0.058,-70.007 -0.058,0.005 31.002,0.005 31.002,-69.997 30.984,-69.997

## Keep-outs
Keep-Out Layer:
  lines w0.1: 0,-70 0,0 30.745,0 30.745,-70 0,-70
  lines w0.2: -10.045,-131.57 14.119,-131.57

## Other copper
Top Layer:
  region net +3V3: 1.917,-9.533 4.786,-9.533 4.995,-9.742 4.995,-10.503 4.632,-10.866 4.632,-14.585 4.334,-14.883 1.917,-14.883 1.496,-14.462 1.496,-9.946 1.91,-9.532
  region net +5V: 8.608,-11.668 8.242,-11.302 8.242,-10.292 7.878,-9.928 6.15,-9.928 5.983,-10.095 5.983,-12.816 6.116,-12.949 9.274,-12.949 9.909,-13.584 11.481,-13.584 11.781,-13.284 11.781,-11.812 11.638,-11.669 10.917,-11.669 10.663,-11.668
  region net VBUS: 13.711,-5.483 13.711,-6.88 14.092,-7.261 14.092,-9.5 13.537,-10.055 10.663,-10.055 9.393,-10.055 9.266,-9.928 9.266,-8.404 9.393,-8.277 12,-8.277 13.152,-7.125 13.152,-5.483
  region net VBUS: 17.732,-6.875 17.099,-6.875 16.972,-7.002 16.972,-8.272 17.034,-8.335 18.505,-8.335 18.505,-6.613 18.505,-5.389 17.964,-5.395 17.964,-6.642
Bottom Layer:
  region net VBUS: 18.842,-6.784 18.908,-6.851 18.908,-8.321 18.86,-8.369 13.544,-8.369 13.153,-7.978 13.153,-7.263 13.629,-6.787 18.706,-6.787

## Silkscreen, mask and mechanical layers (free items; w line width, h text height)
Top Overlay:
  drawing of 6 lines, arcs and shapes, not listed
  text "IO42" at 21.681,-6.468 h0.8
  text "IO41" at 21.681,-7.736 h0.8
  text "IO40" at 21.681,-9.004 h0.8
  text "IO39" at 21.681,-10.272 h0.8
  text "IO38" at 21.681,-11.54 h0.8
  text "IO48" at 21.681,-12.808 h0.8
  text "IO47" at 21.681,-14.076 h0.8
  text "PWR" at 2.271,-14.541 h2 r90
  text "GND" at 21.681,-15.344 h0.8
  text "3V3" at 6.361,-43.855 h0.8
  text "GND" at 6.172,-45.087 h0.8
  text "TXD" at 6.172,-46.355 h0.8
  text "VGA" at 28.457,-47.146 h2 r90
  text "RXD" at 6.172,-47.623 h0.8
  text "ESP" at 26.592,-48.812 h2 r90
  text "IO0" at 6.172,-48.891 h0.8
  text "EN" at 6.172,-50.159 h0.8
  text "NOV. 2026 | REV. A" at 30.346,-52.831 h1 r90

## Text inside footprints (layer, text, board x,y; h text height)
J2: Mechanical 13 "PCB EDGE" at 10.427,1.279 h0.41 r180